# Altium PCB K601-6252双模带屏 VER 1.1 2026 10 16.PcbDoc (part 11 of 12)
Units mm, origin at the board's own origin, x right, y up, seen from the top; angles counter-clockwise.
Board outline 75.02 x 25.73 mm, 2 copper layers (Top Layer, Bottom Layer); 43 components, 67 nets, 219 pads, 157 vias.
Unrouted connection lines stored in the file: 1.
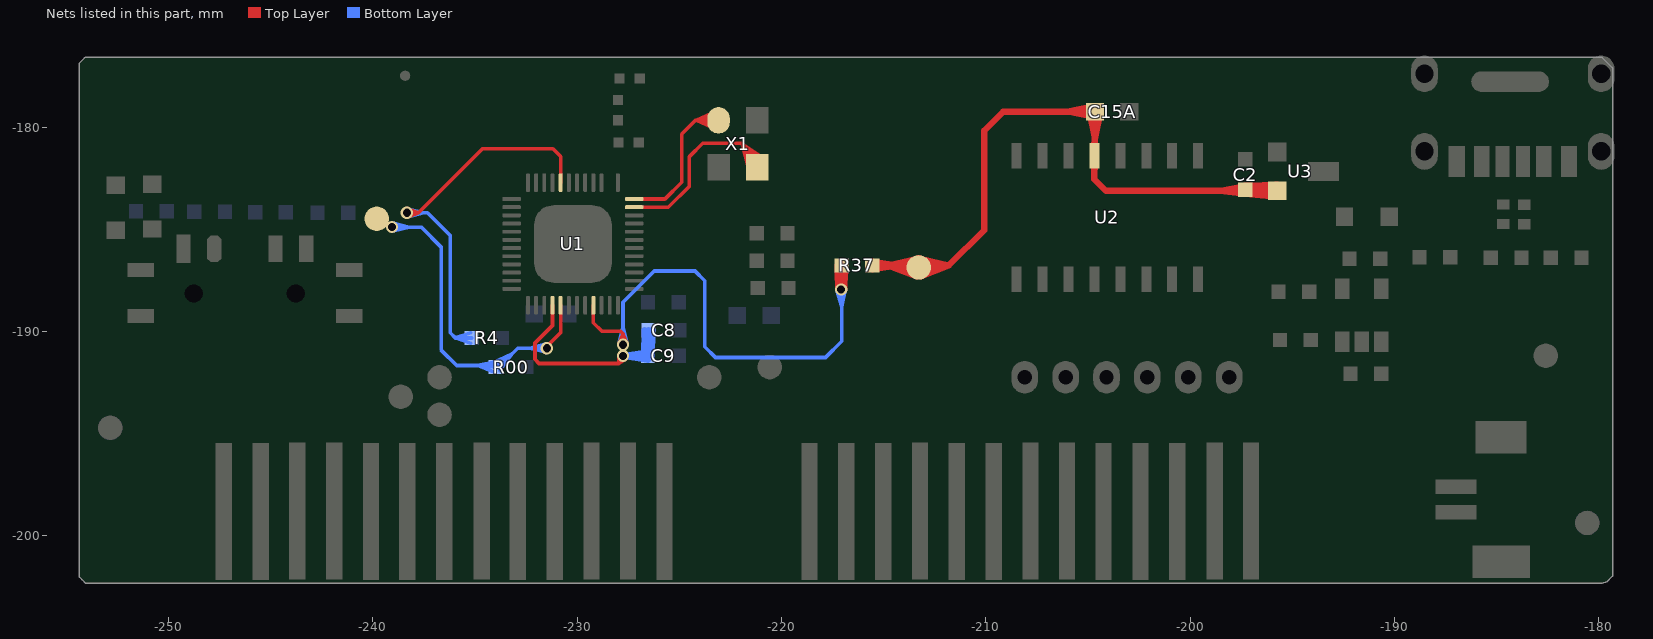
[diagram p11: the nets of this part, all layers, seen from the top]

## Via types
v1: diameter 0.6, hole 0.4, Top Layer to Bottom Layer, tented both sides, 154 vias
v2: diameter 0.6, hole 0.4, Top Layer to Bottom Layer, 3 vias

## Nets (pads, with @x,y where several pads share a name; then routed paths per layer and width w, separated by ;. In a path a pad name is that pad's centre, name@x,y a point inside that pad or via, vN(x,y) a via of type N, cw(c..) or ccw(c..) an arc to the next point about the centre after c; other vN are vias at no path point) (continued)
VCC3.3V: C2.1 C8.1 C9.1 C15A.2 pad.@-213.275,-186.873 R37.1 R37.2 U1.28 U1.33 U2.5 U3.2 | length 980.8
  Top Layer w0.18: U1.28@-231.2,-188.723 -231.2,-189.716 -232.057,-190.573 -232.057,-191.37 -231.859,-191.568 -227.955,-191.568 ; U1.33@-229.2,-188.723 -229.2,-189.573 ; v1@-227.735,-191.348 -227.955,-191.568 ; R37.1@-217.309,-186.792 v1@-217.104,-187.79 ; R37.1@-217.309,-186.748 v1@-217.272,-187.741 ; R37.1@-217.308,-186.805 v1@-217.07,-187.663 ; R37.1@-217.307,-186.809 v1@-217.038,-187.783 ; R37.1@-217.301,-186.839 v1@-216.915,-187.795 ; R37.1@-217.3,-186.844 v1@-216.92,-187.697 ; R37.1@-217.3,-186.843 v1@-216.921,-187.71 ; R37.1@-217.297,-186.853 v1@-216.87,-187.742 ; v1@-217.285,-187.959 -217.226,-187.116 v1@-216.875,-187.885 ; v1@-217.285,-187.958 R37.1@-217.226,-187.001 ; v1@-217.285,-187.956 R37.1@-217.217,-187.048 ; v1@-217.284,-187.972 R37.1@-217.284,-187.082 ; v1@-217.284,-187.963 R37.1@-217.242,-187.118 ; v1@-217.284,-187.93 R37.1@-217.101,-186.997 ; v1@-217.284,-187.924 R37.1@-217.05,-186.773 ; v1@-217.283,-187.974 R37.1@-217.298,-187.035 ; v1@-217.283,-187.92 R37.1@-217.068,-187.104 ; v1@-217.283,-187.917 R37.1@-217.057,-187.108 ; v1@-217.282,-187.914 R37.1@-217.046,-187.104 ; v1@-217.282,-187.911 R37.1@-217.017,-187.007 ; v1@-217.281,-187.909 R37.1@-217.014,-187.048 ; v1@-217.275,-187.883 R37.1@-216.885,-187.011 ; v1@-217.273,-187.878 R37.1@-216.881,-187.078 ; v1@-217.271,-187.873 -216.872,-187.123 ; v1@-217.269,-187.867 R37.1@-216.813,-187.041 ; v1@-217.269,-187.866 R37.1@-216.829,-187.089 ; v1@-216.878,-187.874 R37.1@-217.276,-187.114 ; v1@-216.877,-187.877 R37.1@-217.281,-187.057 ; v1@-216.876,-187.881 R37.1@-217.242,-187.118 ; v1@-216.873,-187.892 R37.1@-217.226,-187.001 ; v1@-216.868,-187.983 R37.1@-216.813,-187.041 ; v1@-216.868,-187.981 R37.1@-216.829,-187.089 ; v1@-216.867,-187.919 R37.1@-217.101,-186.997 ; v1@-216.867,-187.918 R37.1@-217.098,-187.046 ; v1@-216.867,-187.972 -216.872,-187.123 ; v1@-216.866,-187.967 R37.1@-216.885,-187.011 ; v1@-216.866,-187.965 R37.1@-216.894,-187.051 ; v1@-216.866,-187.929 R37.1@-217.046,-187.104 ; v1@-216.866,-187.923 R37.1@-217.068,-187.104 ; v1@-216.867,-187.92 R37.1@-217.093,-187.004 ; v1@-216.865,-187.939 R37.1@-217.009,-186.995 ; v1@-216.866,-187.933 R37.1@-217.05,-186.773 ; R37.1@-216.806,-186.863 v1@-217.272,-187.741 ; R37.1@-216.804,-186.856 -217.221,-187.678 ; R37.1@-216.804,-186.855 v1@-217.22,-187.689 ; R37.1@-216.802,-186.849 v1@-217.226,-187.782 ; R37.1@-216.794,-186.819 v1@-217.104,-187.79 ; R37.1@-216.794,-186.816 v1@-217.07,-187.663 ; R37.1@-216.792,-186.803 v1@-217.038,-187.783 ; R37.1@-216.79,-186.771 v1@-216.915,-187.795 ; R37.1@-216.79,-186.759 v1@-216.87,-187.742 ; -231.2,-189.713 U1.28@-231.2,-189.078 ; -231.2,-189.713 U1.28@-231.2,-189.078 ; -231.2,-189.713 U1.28@-231.2,-189.078 ; -229.2,-189.573 -228.775,-189.998 -227.875,-189.998 -227.75,-190.123 ; -229.2,-189.573 U1.33@-229.2,-189.078 ; -229.2,-189.573 U1.33@-229.2,-189.078 ; -229.2,-189.573 U1.33@-229.2,-189.078 ; v1@-227.956,-190.611 -227.75,-190.123 ; v1@-227.956,-190.611 -227.75,-190.123 ; v1@-227.956,-190.611 -227.75,-190.123 ; v1@-227.956,-190.611 -227.75,-190.123 ; -227.955,-191.568 v1@-227.597,-191.342 ; -227.955,-191.568 v1@-227.953,-191.145 ; -227.955,-191.568 v1(-227.75,-191.198) ; -227.955,-191.568 v1@-227.597,-191.342 ; -227.955,-191.568 v1@-227.953,-191.145 ; -227.955,-191.568 v1(-227.75,-191.198) ; -227.955,-191.568 v1@-227.597,-191.342 ; -227.955,-191.568 v1@-227.953,-191.145 ; -227.955,-191.568 v1(-227.75,-191.198) ; -227.955,-191.568 v1@-227.597,-191.342 ; -227.955,-191.568 v1@-227.953,-191.145 ; -227.955,-191.568 v1(-227.75,-191.198) ; -227.955,-191.568 v1@-227.597,-191.342 ; -227.955,-191.568 v1@-227.953,-191.145 ; -227.955,-191.568 v1(-227.75,-191.198) ; v1(-227.75,-190.653) -227.75,-190.123 ; v1(-227.75,-190.653) -227.75,-190.123 ; v1(-227.75,-190.653) -227.75,-190.123 ; -227.75,-190.123 v1@-227.544,-190.611 ; -227.75,-190.123 v1@-227.544,-190.611 ; -227.75,-190.123 v1@-227.544,-190.611 ; -227.75,-190.123 v1@-227.544,-190.611 ; R37.1@-217.31,-186.761 -217.221,-187.678 ; R37.1@-217.31,-186.761 v1@-217.226,-187.782 ; R37.1@-217.31,-186.761 v1@-217.22,-187.689 ; R37.1@-217.308,-186.803 v1@-217.075,-187.663 ; R37.1@-217.308,-186.803 v1@-217.075,-187.663 ; R37.1@-217.308,-186.803 v1@-217.075,-187.663 ; R37.1@-217.308,-186.803 v1@-217.075,-187.663 ; R37.1@-217.308,-186.803 v1@-217.075,-187.662 ; R37.1@-217.298,-187.035 -216.878,-187.875 R37.1@-217.284,-187.082 ; R37.1@-217.298,-187.035 v1(-217.075,-187.948) ; v1@-217.285,-187.958 R37.1@-217.227,-187.01 ; v1@-217.285,-187.959 R37.1@-217.227,-187.101 ; v1@-217.285,-187.959 R37.1@-217.23,-187.001 ; v1@-217.285,-187.96 R37.1@-217.233,-187.081 ; v1@-217.285,-187.96 R37.1@-217.233,-187.081 ; v1@-217.285,-187.96 R37.1@-217.233,-187.081 ; v1@-217.285,-187.96 R37.1@-217.233,-187.081 ; v1@-217.285,-187.96 R37.1@-217.233,-187.081 ; v1@-217.285,-187.96 R37.1@-217.233,-187.081 ; v1@-217.285,-187.96 R37.1@-217.233,-187.081 ; v1@-217.285,-187.96 R37.1@-217.233,-187.081 ; v1@-217.285,-187.96 R37.1@-217.233,-187.077 ; R37.1@-217.284,-187.082 v1(-217.075,-187.948) ; v1@-217.283,-187.921 R37.1@-217.075,-187.108 ; v1@-217.283,-187.921 R37.1@-217.075,-187.108 ; v1@-217.283,-187.921 R37.1@-217.075,-187.108 ; v1@-217.283,-187.921 R37.1@-217.075,-187.108 ; v1@-217.283,-187.918 R37.1@-217.059,-187.107 ; v1@-217.283,-187.918 R37.1@-217.059,-187.107 ; v1@-217.283,-187.918 R37.1@-217.059,-187.107 ; v1@-217.283,-187.918 R37.1@-217.059,-187.107 ; v1@-217.283,-187.917 -217.059,-187.108 v1@-216.866,-187.925 ; v1@-217.283,-187.918 R37.1@-217.059,-187.107 ; v1@-217.283,-187.918 R37.1@-217.059,-187.107 ; v1@-217.283,-187.918 R37.1@-217.059,-187.107 ; R37.1@-217.281,-187.057 -217.284,-187.971 R37.1@-217.276,-187.114 ; R37.1@-217.281,-187.057 v1(-217.075,-187.948) ; v1@-217.275,-187.882 R37.1@-216.874,-186.994 ; v1@-217.275,-187.883 R37.1@-216.894,-187.051 ; v1@-217.275,-187.883 R37.1@-216.879,-187.006 ; R37.1@-217.276,-187.114 v1(-217.075,-187.948) ; v1@-217.273,-187.878 R37.1@-216.881,-187.078 ; v1@-217.273,-187.878 R37.1@-216.881,-187.078 ; v1@-217.273,-187.878 R37.1@-216.881,-187.078 ; v1@-217.273,-187.878 R37.1@-216.881,-187.078 ; v1@-217.273,-187.877 -216.89,-187.121 -216.866,-187.968 R37.1@-216.879,-187.006 ; v1@-217.273,-187.878 R37.1@-216.881,-187.078 ; v1@-217.273,-187.878 R37.1@-216.881,-187.078 ; v1@-217.273,-187.878 R37.1@-216.881,-187.078 ; v1@-217.273,-187.877 R37.1@-216.886,-187.108 ; v1@-217.273,-187.878 R37.1@-216.88,-187.082 ; v1@-217.272,-187.741 R37.1@-217.05,-186.773 ; R37.1@-217.242,-187.118 v1(-217.075,-187.948) ; R37.1@-217.233,-187.081 v1@-216.874,-187.886 ; R37.1@-217.233,-187.081 v1(-217.075,-187.948) ; R37.1@-217.233,-187.081 v1@-216.874,-187.886 ; R37.1@-217.233,-187.081 v1(-217.075,-187.948) ; R37.1@-217.233,-187.081 v1@-216.874,-187.886 ; R37.1@-217.233,-187.081 v1(-217.075,-187.948) ; R37.1@-217.233,-187.081 v1@-216.874,-187.886 ; R37.1@-217.233,-187.081 v1(-217.075,-187.948) ; R37.1@-217.233,-187.081 v1@-216.874,-187.886 ; R37.1@-217.233,-187.081 v1(-217.075,-187.948) ; R37.1@-217.233,-187.081 v1@-216.874,-187.886 ; R37.1@-217.233,-187.081 v1(-217.075,-187.948) ; R37.1@-217.233,-187.081 v1@-216.874,-187.886 ; R37.1@-217.233,-187.081 v1(-217.075,-187.948) ; R37.1@-217.233,-187.081 v1@-216.874,-187.886 ; R37.1@-217.233,-187.081 v1(-217.075,-187.948) ; R37.1@-217.233,-187.077 v1@-216.874,-187.886 ; R37.1@-217.233,-187.077 v1(-217.075,-187.948) ; R37.1@-217.23,-187.001 v1@-216.873,-187.891 ; R37.1@-217.23,-187.001 v1(-217.075,-187.948) ; R37.1@-217.227,-187.101 v1@-216.874,-187.886 ; R37.1@-217.227,-187.101 v1(-217.075,-187.948) ; R37.1@-217.227,-187.01 v1@-216.873,-187.891 ; R37.1@-217.227,-187.01 v1(-217.075,-187.948) ; v1@-217.226,-187.782 R37.1@-217.05,-186.773 ; R37.1@-217.226,-187.001 v1(-217.075,-187.948) ; -217.221,-187.678 R37.1@-217.05,-186.773 ; v1@-217.22,-187.689 R37.1@-217.05,-186.773 ; R37.1@-217.217,-187.048 v1@-216.873,-187.891 ; R37.1@-217.217,-187.048 v1(-217.075,-187.948) ; v1@-217.104,-187.79 R37.1@-217.05,-186.773 ; R37.1@-217.101,-186.997 v1(-217.075,-187.948) ; R37.1@-217.098,-187.046 -217.284,-187.928 R37.1@-217.093,-187.004 ; R37.1@-217.098,-187.046 v1(-217.075,-187.948) ; R37.1@-217.093,-187.004 v1(-217.075,-187.948) ; v1(-217.075,-187.948) -217.075,-186.798 R37.1@-217.05,-186.773 ; v1(-217.075,-187.948) R37.1@-216.881,-187.078 ; v1(-217.075,-187.948) R37.1@-217.059,-187.107 ; v1(-217.075,-187.948) R37.1@-216.881,-187.078 ; v1(-217.075,-187.948) R37.1@-217.059,-187.107 ; v1(-217.075,-187.948) R37.1@-217.075,-187.108 ; v1(-217.075,-187.948) R37.1@-217.075,-187.108 ; v1(-217.075,-187.948) R37.1@-216.881,-187.078 ; v1(-217.075,-187.948) R37.1@-216.881,-187.078 ; v1(-217.075,-187.948) R37.1@-217.059,-187.107 ; v1(-217.075,-187.948) R37.1@-217.059,-187.107 ; v1(-217.075,-187.948) R37.1@-216.881,-187.078 ; v1(-217.075,-187.948) R37.1@-217.059,-187.107 ; v1(-217.075,-187.948) R37.1@-216.881,-187.078 ; v1(-217.075,-187.948) R37.1@-217.059,-187.107 ; v1(-217.075,-187.948) R37.1@-216.881,-187.078 ; v1(-217.075,-187.948) R37.1@-217.059,-187.107 ; v1(-217.075,-187.948) R37.1@-216.881,-187.078 ; v1(-217.075,-187.948) R37.1@-216.874,-186.994 ; v1(-217.075,-187.948) R37.1@-217.05,-186.773 ; v1(-217.075,-187.948) R37.1@-216.832,-187.074 ; v1(-217.075,-187.948) R37.1@-217.016,-187.016 ; v1(-217.075,-187.948) R37.1@-216.894,-187.051 ; v1(-217.075,-187.948) R37.1@-216.813,-187.041 ; v1(-217.075,-187.948) R37.1@-217.009,-186.995 ; v1(-217.075,-187.948) -216.872,-187.123 ; v1(-217.075,-187.948) R37.1@-217.046,-187.104 ; v1(-217.075,-187.948) R37.1@-216.885,-187.011 ; v1(-217.075,-187.948) R37.1@-216.829,-187.089 ; v1(-217.075,-187.948) R37.1@-217.014,-187.048 ; v1(-217.075,-187.948) R37.1@-216.886,-187.108 ; v1(-217.075,-187.948) R37.1@-217.068,-187.104 ; v1(-217.075,-187.948) R37.1@-216.879,-187.006 ; v1(-217.075,-187.948) R37.1@-216.831,-187.067 ; v1(-217.075,-187.948) R37.1@-217.017,-187.007 ; v1(-217.075,-187.948) R37.1@-216.88,-187.082 ; v1(-217.075,-187.948) R37.1@-217.057,-187.108 ; v1@-217.075,-187.663 R37.1@-216.794,-186.818 ; v1@-217.075,-187.663 R37.1@-217.05,-186.773 ; v1@-217.075,-187.663 R37.1@-216.794,-186.818 ; v1@-217.075,-187.663 R37.1@-217.05,-186.773 ; v1@-217.075,-187.663 R37.1@-216.794,-186.818 ; v1@-217.075,-187.663 R37.1@-217.05,-186.773 ; v1@-217.075,-187.663 R37.1@-216.794,-186.818 ; v1@-217.075,-187.663 R37.1@-217.05,-186.773 ; v1@-217.075,-187.662 R37.1@-216.794,-186.818 ; R37.1@-217.075,-187.108 v1@-216.867,-187.921 ; R37.1@-217.075,-187.108 v1@-216.867,-187.921 ; R37.1@-217.075,-187.108 v1@-216.867,-187.921 ; R37.1@-217.075,-187.108 v1@-216.867,-187.921 ; v1@-217.07,-187.663 R37.1@-217.05,-186.773 ; R37.1@-217.059,-187.107 v1@-216.866,-187.925 ; R37.1@-217.059,-187.107 v1@-216.866,-187.925 ; R37.1@-217.059,-187.107 v1@-216.866,-187.925 ; R37.1@-217.059,-187.107 v1@-216.866,-187.925 ; R37.1@-217.059,-187.107 v1@-216.866,-187.925 ; R37.1@-217.059,-187.107 v1@-216.866,-187.925 ; R37.1@-217.059,-187.107 v1@-216.866,-187.925 ; R37.1@-217.057,-187.108 v1@-216.866,-187.926 ; R37.1@-217.05,-186.773 v1@-216.921,-187.71 ; R37.1@-217.05,-186.773 v1@-216.87,-187.742 ; R37.1@-217.05,-186.773 v1@-217.038,-187.783 ; R37.1@-217.05,-186.773 v1@-216.915,-187.795 ; R37.1@-217.05,-186.773 v1@-216.92,-187.697 ; R37.1@-217.017,-187.007 v1@-216.865,-187.937 ; R37.1@-217.016,-187.016 -217.282,-187.911 R37.1@-217.009,-186.995 ; R37.1@-217.016,-187.016 v1@-216.865,-187.937 ; R37.1@-217.014,-187.048 v1@-216.865,-187.937 ; v1@-216.921,-187.71 -216.79,-186.773 v1@-216.92,-187.697 ; R37.1@-216.886,-187.108 v1@-216.866,-187.968 ; R37.1@-216.88,-187.082 v1@-216.866,-187.969 ; R37.1@-216.881,-187.078 v1@-216.866,-187.969 ; R37.1@-216.881,-187.078 v1@-216.866,-187.969 ; R37.1@-216.881,-187.078 v1@-216.866,-187.969 ; R37.1@-216.881,-187.078 v1@-216.866,-187.969 ; R37.1@-216.881,-187.078 v1@-216.866,-187.969 ; R37.1@-216.881,-187.078 v1@-216.866,-187.969 ; R37.1@-216.881,-187.078 v1@-216.866,-187.969 ; R37.1@-216.881,-187.078 v1@-216.866,-187.969 ; R37.1@-216.874,-186.994 v1@-216.866,-187.969 ; R37.1@-216.832,-187.074 -217.27,-187.868 R37.1@-216.831,-187.067 ; R37.1@-216.832,-187.074 -216.868,-187.98 R37.1@-216.831,-187.067
  Top Layer w0.305: U2.5@-204.685,-181.398 -204.685,-182.558 ; -204.651,-179.858 U2.5@-204.685,-181.018 ; C2.1@-197.333,-183.27 U3.2@-196.019,-183.394 ; C2.1@-197.33,-183.271 U3.2@-196.059,-183.363 ; C2.1@-197.329,-183.271 U3.2@-196.054,-183.357 ; C2.1@-197.327,-183.271 U3.2@-195.986,-183.354 ; C2.1@-197.321,-182.879 U3.2@-196.006,-182.839 ; C2.1@-197.316,-182.879 U3.2@-196.043,-182.875 ; C2.1@-197.296,-183.273 U3.2@-195.971,-183.146 ; C2.1@-197.291,-183.273 U3.2@-196.036,-183.116 ; C2.1@-197.287,-183.273 U3.2@-195.972,-183.089 ; C2.1@-197.283,-182.879 U3.2@-195.972,-183.089 ; C2.1@-197.278,-182.879 U3.2@-196.036,-183.116 ; C2.1@-197.277,-182.879 U3.2@-196.032,-183.125 ; C2.1@-197.275,-182.88 U3.2@-195.971,-183.146 ; C2.1@-197.257,-183.269 U3.2@-195.971,-182.881 ; C2.1@-197.255,-183.268 U3.2@-196.031,-182.88 ; C2.1@-197.254,-183.268 U3.2@-196.043,-182.875 ; C2.1@-197.25,-183.267 U3.2@-196.006,-182.839 ; C2.1@-197.245,-182.886 U3.2@-195.986,-183.354 ; C2.1@-197.242,-182.887 U3.2@-196.054,-183.357 ; C2.1@-197.241,-182.887 U3.2@-196.059,-183.363 ; C2.1@-197.238,-182.888 U3.2@-196.019,-183.394 ; U3.2@-195.824,-183.418 C2.1@-197.17,-182.879 ; U3.2@-195.818,-183.42 C2.1@-197.223,-182.894 ; U3.2@-195.805,-182.827 C2.1@-197.181,-183.28 ; U3.2@-195.801,-182.826 C2.1@-197.115,-183.249 ; U3.2@-195.799,-182.826 C2.1@-197.22,-183.257 ; U3.2@-195.798,-182.826 C2.1@-197.197,-183.25 ; U3.2@-195.786,-183.427 C2.1@-197.195,-183.06 ; U3.2@-195.783,-183.427 C2.1@-197.113,-183.086 ; U3.2@-195.767,-182.821 C2.1@-197.196,-183.098 ; U3.2@-195.764,-182.821 C2.1@-197.113,-183.078 ; U3.2@-195.747,-183.43 C2.1@-197.115,-183.249 ; U3.2@-195.744,-183.43 C2.1@-197.231,-183.26 ; U3.2@-195.726,-182.821 C2.1@-197.101,-182.908 ; R37.2@-215.55,-186.773 -211.8,-186.773 ; R37.2@-215.55,-186.773 -214.286,-186.773 ; R37.2@-215.55,-186.773 -214.286,-186.773 ; R37.2@-215.535,-186.97 -214.286,-186.773 ; R37.2@-215.535,-186.97 -214.286,-186.773 ; R37.2@-215.535,-186.97 -214.286,-186.773 ; R37.2@-215.535,-186.97 -214.286,-186.773 ; R37.2@-215.535,-186.576 -214.286,-186.773 ; R37.2@-215.535,-186.576 -214.286,-186.773 ; R37.2@-215.535,-186.576 -214.286,-186.773 ; R37.2@-215.535,-186.576 -214.286,-186.773 ; -214.794,-186.773 pad.@-213.37,-187.31 ; -214.794,-186.773 pad.@-213.312,-186.427 ; -214.794,-186.773 pad.@-213.275,-186.873 ; -214.794,-186.773 pad.@-213.37,-187.31 ; -214.794,-186.773 pad.@-213.312,-186.427 ; -214.794,-186.773 pad.@-213.275,-186.873 ; -214.794,-186.773 pad.@-213.37,-187.31 ; -214.794,-186.773 pad.@-213.312,-186.427 ; -214.794,-186.773 pad.@-213.275,-186.873 ; -214.794,-186.773 pad.@-213.37,-187.31 ; -214.794,-186.773 pad.@-213.312,-186.427 ; -214.794,-186.773 pad.@-213.275,-186.873 ; pad.@-213.37,-187.31 -214.787,-186.773 pad.@-213.312,-186.427 ; pad.@-213.275,-186.873 -211.8,-186.773 ; pad.@-213.275,-186.873 -211.8,-186.773 ; pad.@-213.275,-186.873 -211.8,-186.773 ; pad.@-213.275,-186.873 -211.8,-186.773 ; pad.@-213.237,-186.427 -211.8,-186.773 ; pad.@-213.237,-186.427 -211.8,-186.773 ; pad.@-213.237,-186.427 -211.8,-186.773 ; pad.@-213.237,-186.427 -211.8,-186.773 ; pad.@-213.237,-186.427 -211.8,-186.773 ; pad.@-213.178,-187.309 -211.8,-186.773 ; pad.@-213.178,-187.309 -211.8,-186.773 ; pad.@-213.178,-187.309 -211.8,-186.773 ; pad.@-213.178,-187.309 -211.8,-186.773 ; pad.@-213.178,-187.309 -211.8,-186.773 ; -211.8,-186.773 -210.075,-185.048 -210.075,-180.173 -209.15,-179.248 C15A.2@-204.651,-179.248 ; -206.016,-179.248 C15A.2@-204.704,-179.519 ; -206.016,-179.248 C15A.2@-204.704,-178.976 ; -206.016,-179.248 C15A.2@-204.676,-179.248 ; -206.016,-179.248 C15A.2@-204.704,-179.519 ; -206.016,-179.248 C15A.2@-204.704,-178.976 ; -206.016,-179.248 C15A.2@-204.676,-179.248 ; -206.016,-179.248 C15A.2@-204.704,-179.519 ; -206.016,-179.248 C15A.2@-204.704,-178.976 ; -206.016,-179.248 C15A.2@-204.676,-179.248 ; -206.016,-179.248 C15A.2@-204.704,-179.519 ; -206.016,-179.248 C15A.2@-204.704,-178.976 ; -206.016,-179.248 C15A.2@-204.676,-179.248 ; -206.016,-179.248 C15A.2@-204.704,-179.519 ; -206.016,-179.248 C15A.2@-204.704,-178.976 ; -206.016,-179.248 C15A.2@-204.676,-179.248 ; C15A.2@-204.923,-179.275 -204.651,-180.587 ; C15A.2@-204.923,-179.275 -204.651,-180.587 ; C15A.2@-204.923,-179.275 -204.651,-180.587 ; C15A.2@-204.923,-179.275 -204.651,-180.587 ; -204.685,-182.558 -204.12,-183.123 -195.743,-183.123 U3.2@-195.741,-183.125 ; -204.685,-182.558 U2.5@-204.685,-181.778 ; -204.685,-182.558 U2.5@-204.685,-181.778 ; -204.685,-182.558 U2.5@-204.685,-181.778 ; U2.5@-204.685,-181.778 -204.651,-182.046 ; U2.5@-204.685,-181.778 -204.651,-182.046 ; U2.5@-204.685,-181.778 -204.651,-182.046 ; U2.5@-204.685,-181.018 -204.651,-179.858 U2.5@-204.685,-181.018 ; -204.651,-182.046 C15A.2@-204.651,-179.248 ; -204.651,-180.587 C15A.2@-204.38,-179.275 ; -204.651,-180.587 C15A.2@-204.38,-179.275 ; -204.651,-180.587 C15A.2@-204.38,-179.275 ; -204.651,-180.587 C15A.2@-204.651,-179.248 ; -204.651,-180.587 C15A.2@-204.38,-179.275 ; -204.651,-180.587 C15A.2@-204.651,-179.248 ; -198.567,-183.123 C2.1@-197.308,-183.273 ; -198.567,-183.123 C2.1@-197.323,-182.879 ; -198.567,-183.123 C2.1@-197.3,-183.076 ; -198.567,-183.123 C2.1@-197.308,-183.273 ; -198.567,-183.123 C2.1@-197.323,-182.879 ; -198.567,-183.123 C2.1@-197.3,-183.076 ; -198.567,-183.123 C2.1@-197.308,-183.273 ; -198.567,-183.123 C2.1@-197.323,-182.879 ; -198.567,-183.123 C2.1@-197.3,-183.076 ; -198.567,-183.123 C2.1@-197.308,-183.273 ; -198.567,-183.123 C2.1@-197.323,-182.879 ; -198.567,-183.123 C2.1@-197.3,-183.076 ; C2.1@-197.323,-182.879 -198.564,-183.122 C2.1@-197.308,-183.273 ; C2.1@-197.3,-183.076 U3.2@-196.034,-183.123 ; C2.1@-197.3,-183.076 U3.2@-196.034,-183.123 ; C2.1@-197.3,-183.076 U3.2@-196.006,-182.839 ; C2.1@-197.3,-183.076 U3.2@-195.972,-183.089 ; C2.1@-197.3,-183.076 U3.2@-196.043,-182.875 ; C2.1@-197.3,-183.076 U3.2@-196.036,-183.116 ; C2.1@-197.3,-183.076 U3.2@-196.031,-182.88 ; C2.1@-197.3,-183.076 U3.2@-196.032,-183.125 ; C2.1@-197.3,-183.076 U3.2@-196.034,-183.123 ; C2.1@-197.3,-183.076 U3.2@-195.986,-183.354 ; C2.1@-197.3,-183.076 U3.2@-196.054,-183.357 ; C2.1@-197.3,-183.076 U3.2@-196.019,-183.394 ; C2.1@-197.3,-183.076 U3.2@-195.971,-182.881 ; C2.1@-197.3,-183.076 U3.2@-195.971,-183.146 ; C2.1@-197.3,-183.076 U3.2@-196.059,-183.363 ; C2.1@-197.3,-183.076 U3.2@-196.034,-183.123 ; C2.1@-197.292,-183.273 U3.2@-196.034,-183.123 ; C2.1@-197.292,-183.273 U3.2@-196.034,-183.123 ; C2.1@-197.292,-183.273 -196.036,-183.123 C2.1@-197.277,-182.879 ; C2.1@-197.292,-183.273 U3.2@-196.032,-183.125 ; C2.1@-197.292,-183.273 U3.2@-196.034,-183.123 ; C2.1@-197.292,-183.273 U3.2@-196.034,-183.123 ; C2.1@-197.277,-182.879 U3.2@-196.034,-183.123 ; C2.1@-197.277,-182.879 U3.2@-196.034,-183.123 ; C2.1@-197.277,-182.879 U3.2@-196.034,-183.123 ; C2.1@-197.277,-182.879 U3.2@-196.034,-183.123 ; C2.1@-197.232,-183.093 -195.778,-183.428 C2.1@-197.196,-183.098 ; C2.1@-197.232,-183.093 U3.2@-195.765,-182.821 ; C2.1@-197.232,-183.093 U3.2@-195.741,-183.125 ; C2.1@-197.232,-183.063 U3.2@-195.784,-183.427 ; C2.1@-197.232,-183.063 U3.2@-195.759,-182.821 ; C2.1@-197.232,-183.063 U3.2@-195.741,-183.125 ; C2.1@-197.231,-183.26 -195.799,-182.826 C2.1@-197.228,-183.259 ; C2.1@-197.231,-183.26 U3.2@-195.741,-183.125 ; C2.1@-197.231,-183.092 -195.779,-183.428 C2.1@-197.224,-183.093 ; C2.1@-197.231,-183.092 U3.2@-195.765,-182.821 ; C2.1@-197.231,-183.092 U3.2@-195.741,-183.125 ; C2.1@-197.228,-183.259 -195.744,-183.43 C2.1@-197.22,-183.257 ; C2.1@-197.228,-183.259 U3.2@-195.741,-183.125 ; C2.1@-197.224,-183.093 U3.2@-195.765,-182.821 ; C2.1@-197.224,-183.093 U3.2@-195.741,-183.125 ; C2.1@-197.224,-183.064 U3.2@-195.784,-183.427 ; C2.1@-197.224,-183.064 U3.2@-195.759,-182.821 ; C2.1@-197.224,-183.064 U3.2@-195.741,-183.125 ; C2.1@-197.223,-182.894 U3.2@-195.725,-182.821 ; C2.1@-197.223,-182.894 U3.2@-195.741,-183.125 ; C2.1@-197.22,-183.257 U3.2@-195.741,-183.125 ; C2.1@-197.219,-182.896 U3.2@-195.818,-183.42 ; C2.1@-197.219,-182.896 U3.2@-195.725,-182.821 ; C2.1@-197.219,-182.896 U3.2@-195.741,-183.125 ; C2.1@-197.217,-183.281 U3.2@-195.74,-183.43 ; C2.1@-197.217,-183.281 U3.2@-195.804,-182.827 ; C2.1@-197.217,-183.281 U3.2@-195.741,-183.125 ; C2.1@-197.216,-183.063 -195.785,-183.427 C2.1@-197.113,-183.078 ; C2.1@-197.216,-183.063 U3.2@-195.759,-182.821 ; C2.1@-197.216,-183.063 U3.2@-195.741,-183.125 ; C2.1@-197.217,-182.896 U3.2@-195.818,-183.42 ; C2.1@-197.217,-182.896 U3.2@-195.725,-182.821 ; C2.1@-197.217,-182.896 U3.2@-195.741,-183.125 ; C2.1@-197.211,-183.28 U3.2@-195.74,-183.43 ; C2.1@-197.211,-183.28 U3.2@-195.804,-182.827 ; C2.1@-197.211,-183.28 U3.2@-195.741,-183.125 ; C2.1@-197.208,-182.876 U3.2@-195.822,-183.419 ; C2.1@-197.208,-182.876 U3.2@-195.721,-182.821 ; C2.1@-197.208,-182.876 U3.2@-195.741,-183.125 ; C2.1@-197.204,-183.28 U3.2@-195.74,-183.43 ; C2.1@-197.204,-183.28 U3.2@-195.804,-182.827 ; C2.1@-197.204,-183.28 U3.2@-195.741,-183.125 ; C2.1@-197.197,-183.25 U3.2@-195.746,-183.43 ; C2.1@-197.197,-183.25 U3.2@-195.741,-183.125 ; C2.1@-197.196,-183.098 U3.2@-195.741,-183.125 ; C2.1@-197.195,-183.06 U3.2@-195.759,-182.821 ; C2.1@-197.195,-183.06 U3.2@-195.741,-183.125 ; C2.1@-197.194,-182.878 U3.2@-195.823,-183.419 ; C2.1@-197.194,-182.878 U3.2@-195.721,-182.821 ; C2.1@-197.194,-182.878 U3.2@-195.741,-183.125 ; C2.1@-197.189,-182.907 U3.2@-195.817,-183.42 ; C2.1@-197.189,-182.907 U3.2@-195.727,-182.821 ; C2.1@-197.189,-182.907 U3.2@-195.741,-183.125 ; C2.1@-197.186,-182.879 U3.2@-195.823,-183.419 ; C2.1@-197.186,-182.879 U3.2@-195.721,-182.821 ; C2.1@-197.186,-182.879 U3.2@-195.741,-183.125 ; C2.1@-197.181,-183.28 U3.2@-195.74,-183.43 ; C2.1@-197.181,-183.28 U3.2@-195.741,-183.125 ; C2.1@-197.17,-182.879 U3.2@-195.721,-182.821 ; C2.1@-197.17,-182.879 U3.2@-195.741,-183.125 ; C2.1@-197.115,-183.249 U3.2@-195.741,-183.125 ; C2.1@-197.113,-183.086 U3.2@-195.766,-182.821 ; C2.1@-197.113,-183.086 U3.2@-195.741,-183.125 ; C2.1@-197.112,-183.251 U3.2@-195.747,-183.43 ; C2.1@-197.112,-183.251 U3.2@-195.802,-182.827 ; C2.1@-197.112,-183.251 U3.2@-195.741,-183.125 ; C2.1@-197.112,-183.123 U3.2@-195.775,-183.428 ; C2.1@-197.112,-183.123 U3.2@-195.774,-182.822 ; C2.1@-197.112,-183.123 U3.2@-195.741,-183.125 ; C2.1@-197.112,-183.123 U3.2@-195.775,-183.428 ; C2.1@-197.112,-183.123 U3.2@-195.774,-182.822 ; C2.1@-197.112,-183.123 U3.2@-195.741,-183.125 ; C2.1@-197.112,-183.123 U3.2@-195.775,-183.428 ; C2.1@-197.112,-183.123 U3.2@-195.774,-182.822 ; C2.1@-197.112,-183.123 U3.2@-195.775,-183.428 ; C2.1@-197.112,-183.123 U3.2@-195.774,-182.822 ; C2.1@-197.112,-183.123 U3.2@-195.741,-183.125 ; C2.1@-197.112,-183.123 U3.2@-195.775,-183.428 ; C2.1@-197.112,-183.123 U3.2@-195.774,-182.822 ; C2.1@-197.112,-183.123 U3.2@-195.741,-183.125 ; C2.1@-197.112,-183.083 U3.2@-195.784,-183.427 ; C2.1@-197.112,-183.083 U3.2@-195.765,-182.821 ; C2.1@-197.112,-183.083 U3.2@-195.741,-183.125 ; C2.1@-197.113,-183.078 U3.2@-195.741,-183.125 ; C2.1@-197.111,-183.251 U3.2@-195.746,-183.43 ; C2.1@-197.111,-183.251 U3.2@-195.802,-182.827 ; C2.1@-197.111,-183.251 U3.2@-195.741,-183.125 ; C2.1@-197.111,-183.251 U3.2@-195.746,-183.43 ; C2.1@-197.111,-183.251 U3.2@-195.802,-182.827 ; C2.1@-197.111,-183.251 U3.2@-195.741,-183.125 ; C2.1@-197.111,-183.251 U3.2@-195.746,-183.43 ; C2.1@-197.111,-183.251 U3.2@-195.802,-182.827 ; C2.1@-197.111,-183.251 U3.2@-195.741,-183.125 ; C2.1@-197.111,-183.251 U3.2@-195.746,-183.43 ; C2.1@-197.111,-183.251 U3.2@-195.802,-182.827 ; C2.1@-197.111,-183.251 U3.2@-195.741,-183.125 ; C2.1@-197.111,-183.251 U3.2@-195.746,-183.43 ; C2.1@-197.111,-183.251 U3.2@-195.802,-182.827 ; C2.1@-197.111,-183.251 U3.2@-195.741,-183.125 ; C2.1@-197.111,-183.251 U3.2@-195.746,-183.43 ; C2.1@-197.111,-183.251 U3.2@-195.802,-182.827 ; C2.1@-197.111,-183.251 U3.2@-195.741,-183.125 ; C2.1@-197.111,-183.251 U3.2@-195.746,-183.43 ; C2.1@-197.111,-183.251 U3.2@-195.802,-182.827 ; C2.1@-197.111,-183.251 U3.2@-195.741,-183.125 ; C2.1@-197.111,-183.251 U3.2@-195.746,-183.43 ; C2.1@-197.111,-183.251 U3.2@-195.802,-182.827 ; C2.1@-197.111,-183.251 U3.2@-195.741,-183.125 ; C2.1@-197.112,-183.083 U3.2@-195.784,-183.427 ; C2.1@-197.112,-183.083 U3.2@-195.765,-182.821 ; C2.1@-197.112,-183.083 U3.2@-195.741,-183.125 ; C2.1@-197.112,-183.083 U3.2@-195.784,-183.427 ; C2.1@-197.112,-183.083 U3.2@-195.765,-182.821 ; C2.1@-197.112,-183.083 U3.2@-195.741,-183.125 ; C2.1@-197.112,-183.083 U3.2@-195.784,-183.427 ; C2.1@-197.112,-183.083 U3.2@-195.765,-182.821 ; C2.1@-197.112,-183.083 U3.2@-195.741,-183.125 ; C2.1@-197.112,-183.083 U3.2@-195.784,-183.427 ; C2.1@-197.112,-183.083 U3.2@-195.765,-182.821 ; C2.1@-197.112,-183.083 U3.2@-195.784,-183.427 ; C2.1@-197.112,-183.083 U3.2@-195.765,-182.821 ; C2.1@-197.112,-183.083 U3.2@-195.741,-183.125 ; C2.1@-197.112,-183.083 U3.2@-195.784,-183.427 ; C2.1@-197.112,-183.083 U3.2@-195.765,-182.821 ; C2.1@-197.112,-183.083 U3.2@-195.741,-183.125 ; C2.1@-197.112,-183.083 U3.2@-195.784,-183.427 ; C2.1@-197.112,-183.083 U3.2@-195.765,-182.821 ; C2.1@-197.112,-183.083 U3.2@-195.741,-183.125 ; C2.1@-197.112,-183.083 U3.2@-195.784,-183.427 ; C2.1@-197.112,-183.083 U3.2@-195.765,-182.821 ; C2.1@-197.112,-183.083 U3.2@-195.741,-183.125 ; C2.1@-197.112,-183.082 U3.2@-195.784,-183.427 ; C2.1@-197.112,-183.082 U3.2@-195.765,-182.821 ; C2.1@-197.112,-183.082 U3.2@-195.741,-183.125 ; C2.1@-197.111,-183.252 U3.2@-195.746,-183.43 ; C2.1@-197.111,-183.252 U3.2@-195.802,-182.827 ; C2.1@-197.111,-183.252 U3.2@-195.741,-183.125 ; C2.1@-197.108,-183.255 U3.2@-195.746,-183.43 ; C2.1@-197.108,-183.255 U3.2@-195.803,-182.827 ; C2.1@-197.108,-183.255 U3.2@-195.741,-183.125 ; C2.1@-197.108,-182.914 U3.2@-195.82,-183.419 ; C2.1@-197.108,-182.914 U3.2@-195.728,-182.821 ; C2.1@-197.108,-182.914 U3.2@-195.741,-183.125 ; C2.1@-197.106,-182.913 U3.2@-195.82,-183.419 ; C2.1@-197.106,-182.913 U3.2@-195.727,-182.821 ; C2.1@-197.106,-182.913 U3.2@-195.741,-183.125 ; C2.1@-197.106,-182.913 U3.2@-195.82,-183.419 ; C2.1@-197.106,-182.913 U3.2@-195.727,-182.821 ; C2.1@-197.106,-182.913 U3.2@-195.741,-183.125 ; C2.1@-197.106,-182.913 U3.2@-195.82,-183.419 ; C2.1@-197.106,-182.913 U3.2@-195.727,-182.821 ; C2.1@-197.106,-182.913 U3.2@-195.741,-183.125 ; C2.1@-197.106,-182.913 U3.2@-195.82,-183.419 ; C2.1@-197.106,-182.913 U3.2@-195.727,-182.821 ; C2.1@-197.106,-182.913 U3.2@-195.741,-183.125 ; C2.1@-197.107,-182.913 U3.2@-195.82,-183.419 ; C2.1@-197.107,-182.913 U3.2@-195.727,-182.821 ; C2.1@-197.107,-182.913 U3.2@-195.741,-183.125 ; C2.1@-197.107,-182.913 U3.2@-195.82,-183.419 ; C2.1@-197.107,-182.913 U3.2@-195.727,-182.821 ; C2.1@-197.107,-182.913 U3.2@-195.741,-183.125 ; C2.1@-197.106,-182.913 U3.2@-195.82,-183.419 ; C2.1@-197.106,-182.913 U3.2@-195.727,-182.821 ; C2.1@-197.106,-182.913 U3.2@-195.741,-183.125 ; C2.1@-197.106,-182.913 U3.2@-195.82,-183.419 ; C2.1@-197.106,-182.913 U3.2@-195.727,-182.821 ; C2.1@-197.106,-182.913 U3.2@-195.741,-183.125 ; C2.1@-197.106,-182.913 U3.2@-195.82,-183.419 ; C2.1@-197.106,-182.913 U3.2@-195.727,-182.821 ; C2.1@-197.106,-182.913 U3.2@-195.741,-183.125 ; C2.1@-197.105,-182.912 -195.821,-183.419 -197.101,-182.914 U3.2@-195.727,-182.821 ; C2.1@-197.105,-182.912 U3.2@-195.727,-182.821 ; C2.1@-197.105,-182.912 U3.2@-195.741,-183.125 ; C2.1@-197.101,-182.908 U3.2@-195.822,-183.419 ; C2.1@-197.101,-182.908 U3.2@-195.741,-183.125 ; U3.2@-196.031,-182.88 -197.315,-182.879 U3.2@-195.971,-182.881 ; U3.2@-195.802,-182.827 -197.108,-183.251 U3.2@-195.747,-183.43
  Bottom Layer w0.18: v1@-217.05,-188.223 -217.05,-190.488 -217.838,-191.275 -223.225,-191.275 -223.753,-190.748 -223.753,-187.52 -224.225,-187.048 -226.223,-187.048 -227.75,-188.575 v1(-227.75,-190.653) ; v1@-227.958,-190.627 -227.75,-189.813 ; v1@-227.958,-190.627 -227.75,-189.813 ; v1@-227.958,-190.627 -227.75,-189.813 ; v1@-227.958,-190.627 -227.75,-189.813 ; v1(-227.75,-190.653) -227.75,-189.813 ; v1(-227.75,-190.653) -227.75,-189.813 ; -227.75,-189.813 v1@-227.542,-190.627 ; -227.75,-189.813 v1@-227.542,-190.627 ; -227.75,-189.813 v1@-227.542,-190.627 ; -227.75,-189.813 v1@-227.542,-190.627 ; v1@-217.283,-187.98 -217.05,-188.796 ; v1@-217.283,-187.98 -217.05,-188.796 ; v1@-217.283,-187.98 -217.05,-188.796 ; v1@-217.283,-187.98 -217.05,-188.787 v1@-216.866,-187.968 ; v1@-217.283,-187.98 -217.05,-188.796 ; v1(-217.075,-187.948) -217.05,-188.796 ; v1(-217.075,-187.948) -217.05,-188.796 ; v1(-217.075,-187.948) -217.05,-188.796 ; v1(-217.075,-187.948) -217.05,-188.796 ; -217.05,-188.796 v1@-216.866,-187.967 ; -217.05,-188.796 v1@-216.866,-187.967 ; -217.05,-188.796 v1@-216.866,-187.967 ; -217.05,-188.796 v1@-216.866,-187.967
  Bottom Layer w0.305: v1(-227.75,-191.198) C9.1@-226.525,-191.198 ; v1(-227.75,-191.198) C9.1@-226.541,-191.395 ; v1(-227.75,-191.198) C9.1@-226.541,-191.001 ; v1(-227.75,-191.198) C9.1@-226.541,-191.395 ; v1(-227.75,-191.198) C9.1@-226.541,-191.001 ; v1(-227.75,-191.198) C9.1@-226.541,-191.395 ; v1(-227.75,-191.198) C9.1@-226.541,-191.001 ; v1(-227.75,-191.198) C9.1@-226.525,-191.198 ; v1(-227.75,-191.198) C9.1@-226.541,-191.395 ; v1(-227.75,-191.198) C9.1@-226.541,-191.001 ; v1(-227.75,-191.198) C9.1@-226.525,-191.198 ; C9.1@-226.722,-191.209 C8.1@-226.697,-189.959 ; C9.1@-226.722,-191.209 C8.1@-226.309,-189.997 ; C9.1@-226.722,-191.209 C8.1@-226.697,-189.928 ; C9.1@-226.722,-191.209 C8.1@-226.5,-189.948 ; C9.1@-226.722,-191.209 C8.1@-226.697,-189.928 ; C9.1@-226.722,-191.209 C8.1@-226.693,-189.99 ; C9.1@-226.722,-191.209 C8.1@-226.309,-189.997 ; C9.1@-226.722,-191.209 C8.1@-226.697,-189.928 ; C9.1@-226.722,-191.209 C8.1@-226.5,-189.948 ; C9.1@-226.722,-191.209 C8.1@-226.309,-189.997 ; C9.1@-226.722,-191.209 C8.1@-226.697,-189.928 ; C9.1@-226.722,-191.209 C8.1@-226.5,-189.948 ; C9.1@-226.722,-191.182 C8.1@-226.525,-189.973 ; C9.1@-226.722,-191.182 C8.1@-226.309,-189.998 ; C9.1@-226.722,-191.182 C8.1@-226.697,-189.928 ; C9.1@-226.722,-191.182 C8.1@-226.5,-189.948 ; C9.1@-226.722,-191.182 C8.1@-226.525,-189.973 ; C9.1@-226.722,-191.182 C8.1@-226.525,-189.973 ; C9.1@-226.722,-191.182 C8.1@-226.525,-189.973 ; C9.1@-226.722,-191.182 C8.1@-226.309,-189.998 ; C9.1@-226.722,-191.182 C8.1@-226.697,-189.928 ; C9.1@-226.722,-191.182 C8.1@-226.5,-189.948 ; C9.1@-226.722,-191.182 C8.1@-226.309,-189.998 ; C9.1@-226.722,-191.182 C8.1@-226.697,-189.928 ; C9.1@-226.722,-191.182 C8.1@-226.5,-189.948 ; C9.1@-226.722,-191.182 C8.1@-226.309,-189.998 ; C9.1@-226.722,-191.182 C8.1@-226.697,-189.928 ; C9.1@-226.722,-191.182 C8.1@-226.5,-189.948 ; C9.1@-226.722,-191.182 C8.1@-226.309,-189.998 ; C9.1@-226.722,-191.182 C8.1@-226.697,-189.928 ; C9.1@-226.722,-191.182 C8.1@-226.309,-189.998 ; C9.1@-226.722,-191.182 C8.1@-226.697,-189.928 ; C9.1@-226.722,-191.182 C8.1@-226.5,-189.948 ; C9.1@-226.722,-191.182 C8.1@-226.309,-189.998 ; C9.1@-226.722,-191.182 C8.1@-226.697,-189.928 ; C9.1@-226.722,-191.182 C8.1@-226.5,-189.948 ; C9.1@-226.722,-191.182 C8.1@-226.309,-189.998 ; C9.1@-226.722,-191.182 C8.1@-226.697,-189.928 ; C9.1@-226.722,-191.182 C8.1@-226.5,-189.948 ; C9.1@-226.722,-191.178 C8.1@-226.5,-189.948 ; C9.1@-226.722,-191.178 C8.1@-226.5,-189.948 ; C9.1@-226.722,-191.178 C8.1@-226.5,-189.948 ; C9.1@-226.722,-191.178 C8.1@-226.309,-189.998 ; C9.1@-226.722,-191.178 C8.1@-226.697,-189.928 ; C9.1@-226.722,-191.178 C8.1@-226.309,-189.998 ; C9.1@-226.722,-191.178 C8.1@-226.697,-189.928 ; C9.1@-226.722,-191.178 C8.1@-226.309,-189.998 ; C9.1@-226.722,-191.178 C8.1@-226.697,-189.928 ; C9.1@-226.716,-191.148 C8.1@-226.303,-189.936 ; C9.1@-226.716,-191.148 C8.1@-226.309,-189.998 ; C9.1@-226.716,-191.148 C8.1@-226.697,-189.928 ; C9.1@-226.716,-191.148 C8.1@-226.5,-189.948 ; C9.1@-226.716,-191.147 C8.1@-226.303,-189.967 ; C9.1@-226.716,-191.147 C8.1@-226.309,-189.998 ; C9.1@-226.716,-191.147 C8.1@-226.309,-189.998 ; C9.1@-226.716,-191.147 C8.1@-226.697,-189.928 ; C9.1@-226.716,-191.147 C8.1@-226.5,-189.948 ; C9.1@-226.716,-191.147 C8.1@-226.309,-189.998 ; C9.1@-226.716,-191.147 C8.1@-226.697,-189.928 ; C9.1@-226.716,-191.147 C8.1@-226.5,-189.948 ; C8.1@-226.697,-189.959 C9.1@-226.525,-191.198 ; C8.1@-226.697,-189.959 C9.1@-226.332,-191.155 ; C8.1@-226.697,-189.959 C9.1@-226.525,-191.198 ; C8.1@-226.697,-189.959 C9.1@-226.525,-191.198 ; C8.1@-226.697,-189.959 C9.1@-226.525,-191.198 ; C8.1@-226.697,-189.959 C9.1@-226.525,-191.198 ; C8.1@-226.697,-189.959 C9.1@-226.525,-191.198 ; C8.1@-226.697,-189.959 C9.1@-226.525,-191.198 ; C8.1@-226.697,-189.959 C9.1@-226.525,-191.198 ; C8.1@-226.697,-189.959 C9.1@-226.525,-191.198 ; C8.1@-226.697,-189.959 C9.1@-226.525,-191.198 ; C8.1@-226.697,-189.959 C9.1@-226.525,-191.198 ; C8.1@-226.697,-189.959 C9.1@-226.525,-191.198 ; C8.1@-226.697,-189.959 C9.1@-226.525,-191.198 ; C8.1@-226.697,-189.928 C9.1@-226.332,-191.156 ; C8.1@-226.697,-189.928 C9.1@-226.525,-191.198 ; C8.1@-226.693,-189.99 C9.1@-226.328,-191.182 ; C8.1@-226.693,-189.99 C9.1@-226.332,-191.155 ; C8.1@-226.693,-189.99 C9.1@-226.525,-191.198 ; C8.1@-226.693,-189.99 C9.1@-226.328,-191.182 ; C8.1@-226.693,-189.99 C9.1@-226.328,-191.182 ; C8.1@-226.693,-189.99 C9.1@-226.328,-191.182 ; C8.1@-226.693,-189.99 C9.1@-226.328,-191.182 ; C8.1@-226.693,-189.991 C9.1@-226.332,-191.156 ; C8.1@-226.693,-189.99 C9.1@-226.328,-191.182 ; C8.1@-226.693,-189.99 C9.1@-226.328,-191.182 ; C8.1@-226.693,-189.99 C9.1@-226.328,-191.182 ; C8.1@-226.693,-189.991 C9.1@-226.332,-191.155 ; C8.1@-226.693,-189.99 C9.1@-226.328,-191.186 ; C8.1@-226.693,-189.99 C9.1@-226.328,-191.186 ; C8.1@-226.693,-189.991 C9.1@-226.332,-191.155 ; C8.1@-226.693,-189.99 C9.1@-226.328,-191.186 ; C8.1@-226.693,-189.989 C9.1@-226.328,-191.217 ; C8.1@-226.693,-189.989 C9.1@-226.328,-191.217 ; C8.1@-226.693,-189.989 C9.1@-226.328,-191.217 ; C9.1@-226.525,-191.198 C8.1@-226.525,-189.973 ; C9.1@-226.525,-191.198 C8.1@-226.303,-189.967 ; C9.1@-226.525,-191.198 C8.1@-226.5,-189.948 ; C9.1@-226.525,-191.198 C8.1@-226.525,-189.973 ; C9.1@-226.525,-191.198 C8.1@-226.525,-189.973 ; C9.1@-226.525,-191.198 C8.1@-226.309,-189.998 ; C9.1@-226.525,-191.198 C8.1@-226.5,-189.948 ; C9.1@-226.525,-191.198 C8.1@-226.303,-189.936 ; C9.1@-226.525,-191.198 C8.1@-226.5,-189.948 ; C9.1@-226.525,-191.198 C8.1@-226.303,-189.967 ; C9.1@-226.525,-191.198 C8.1@-226.5,-189.948 ; C9.1@-226.525,-191.198 C8.1@-226.303,-189.967 ; C9.1@-226.525,-191.198 C8.1@-226.5,-189.948 ; C9.1@-226.525,-191.198 C8.1@-226.303,-189.967 ; C9.1@-226.525,-191.198 C8.1@-226.5,-189.948 ; C9.1@-226.525,-191.198 C8.1@-226.303,-189.967 ; C9.1@-226.525,-191.198 C8.1@-226.303,-189.967 ; C9.1@-226.525,-191.198 C8.1@-226.5,-189.948 ; C9.1@-226.525,-191.198 C8.1@-226.303,-189.967 ; C9.1@-226.525,-191.198 C8.1@-226.5,-189.948 ; C9.1@-226.525,-191.198 C8.1@-226.303,-189.967 ; C9.1@-226.525,-191.198 C8.1@-226.5,-189.948 ; C9.1@-226.525,-191.198 C8.1@-226.303,-189.967 ; C9.1@-226.525,-191.198 C8.1@-226.5,-189.948 ; C9.1@-226.525,-191.198 C8.1@-226.303,-189.967 ; C9.1@-226.525,-191.198 C8.1@-226.303,-189.967 ; C9.1@-226.525,-191.198 C8.1@-226.5,-189.948 ; C9.1@-226.525,-191.198 C8.1@-226.303,-189.967 ; C9.1@-226.525,-191.198 C8.1@-226.5,-189.948 ; C9.1@-226.525,-191.198 C8.1@-226.303,-189.967 ; C8.1@-226.525,-189.973 C8.1@-226.5,-189.948 ; C8.1@-226.525,-189.973 C9.1@-226.328,-191.182 ; C8.1@-226.525,-189.973 C9.1@-226.328,-191.182 ; C8.1@-226.525,-189.973 C9.1@-226.328,-191.182 ; C8.1@-226.525,-189.973 C9.1@-226.328,-191.182 ; C8.1@-226.5,-189.948 C9.1@-226.328,-191.182 ; C8.1@-226.5,-189.948 C9.1@-226.328,-191.186 ; C8.1@-226.5,-189.948 C9.1@-226.328,-191.186 ; C8.1@-226.5,-189.948 C9.1@-226.328,-191.186 ; C8.1@-226.5,-189.948 C9.1@-226.328,-191.182 ; C8.1@-226.5,-189.948 C9.1@-226.328,-191.182 ; C8.1@-226.5,-189.948 C9.1@-226.328,-191.182 ; C8.1@-226.5,-189.948 C9.1@-226.332,-191.156 ; C8.1@-226.5,-189.948 C9.1@-226.328,-191.182 ; C8.1@-226.5,-189.948 C9.1@-226.328,-191.182 ; C8.1@-226.5,-189.948 C9.1@-226.328,-191.182 ; C8.1@-226.5,-189.948 C9.1@-226.328,-191.217 ; C8.1@-226.5,-189.948 C9.1@-226.332,-191.155 ; C8.1@-226.5,-189.948 C9.1@-226.328,-191.217 ; C8.1@-226.5,-189.948 C9.1@-226.328,-191.217 ; C8.1@-226.5,-189.948 C9.1@-226.332,-191.155 ; C9.1@-226.332,-191.155 C8.1@-226.303,-189.936 ; C9.1@-226.332,-191.156 C8.1@-226.303,-189.936 ; C9.1@-226.332,-191.155 C8.1@-226.303,-189.936 ; C9.1@-226.328,-191.217 C8.1@-226.303,-189.967 ; C9.1@-226.328,-191.217 C8.1@-226.303,-189.936 ; C9.1@-226.328,-191.217 C8.1@-226.303,-189.936 ; C9.1@-226.328,-191.217 C8.1@-226.303,-189.936 ; C9.1@-226.328,-191.217 C8.1@-226.309,-189.998 ; C9.1@-226.328,-191.217 C8.1@-226.303,-189.936 ; C9.1@-226.328,-191.186 C8.1@-226.303,-189.936 ; C9.1@-226.328,-191.186 C8.1@-226.303,-189.936 ; C9.1@-226.328,-191.186 C8.1@-226.303,-189.936 ; C9.1@-226.328,-191.182 C8.1@-226.303,-189.936 ; C9.1@-226.328,-191.182 C8.1@-226.303,-189.936 ; C9.1@-226.328,-191.182 C8.1@-226.303,-189.936 ; C9.1@-226.328,-191.182 C8.1@-226.303,-189.936 ; C9.1@-226.328,-191.182 C8.1@-226.303,-189.936 ; C9.1@-226.328,-191.182 C8.1@-226.303,-189.936 ; C9.1@-226.328,-191.182 C8.1@-226.303,-189.936 ; C9.1@-226.328,-191.182 C8.1@-226.303,-189.936
VDD_LED: R4.2 U1.8 | length 42.6
  Top Layer w0.18: U1.8@-230.8,-182.723 -230.8,-181.448 -231.18,-181.068 -234.622,-181.068 -237.752,-184.198 ; v1(-238.325,-184.198) -237.752,-184.198 ; v1(-238.325,-184.198) -237.752,-184.198 ; v1(-238.325,-184.198) -237.752,-184.198 ; v1@-238.287,-184.404 -237.752,-184.198 ; v1@-238.287,-184.404 -237.752,-184.198 ; v1@-238.287,-184.404 -237.752,-184.198 ; v1@-238.287,-184.404 -237.752,-184.198 ; v1@-238.287,-183.991 -237.752,-184.198 ; v1@-238.287,-183.991 -237.752,-184.198 ; v1@-238.287,-183.991 -237.752,-184.198 ; v1@-238.287,-183.991 -237.752,-184.198 ; U1.8@-230.8,-182.368 -230.8,-181.733 ; U1.8@-230.8,-182.368 -230.8,-181.733 ; U1.8@-230.8,-182.368 -230.8,-181.733
  Bottom Layer w0.18: v1(-238.325,-184.198) -237.32,-184.198 -236.207,-185.311 -236.207,-190.066 -235.95,-190.323 ; v1(-238.325,-184.198) -237.485,-184.198 ; v1(-238.325,-184.198) -237.485,-184.198 ; v1@-238.299,-184.406 -237.485,-184.198 ; v1@-238.299,-184.406 -237.485,-184.198 ; v1@-238.299,-184.406 -237.485,-184.198 ; v1@-238.299,-184.406 -237.485,-184.198 ; v1@-238.299,-183.989 -237.485,-184.198 ; v1@-238.299,-183.989 -237.485,-184.198 ; v1@-238.299,-183.989 -237.485,-184.198 ; v1@-238.299,-183.989 -237.485,-184.198 ; -235.95,-190.323 R4.2@-235.166,-190.323 ; -235.95,-190.323 R4.2@-235.209,-190.579 ; -235.95,-190.323 R4.2@-235.209,-190.066 ; -235.95,-190.323 R4.2@-235.209,-190.579 ; -235.95,-190.323 R4.2@-235.209,-190.066 ; -235.95,-190.323 R4.2@-235.209,-190.579 ; -235.95,-190.323 R4.2@-235.209,-190.066 ; -235.95,-190.323 R4.2@-235.166,-190.323 ; -235.95,-190.323 R4.2@-235.209,-190.579 ; -235.95,-190.323 R4.2@-235.209,-190.066 ; -235.95,-190.323 R4.2@-235.166,-190.323
VPP: pad.@-239.8,-184.495 R00.2 U1.29 | length 65.6
  Top Layer w0.18: v1@-231.475,-190.734 -230.8,-190.059 U1.29@-230.8,-188.723 ; -230.8,-189.713 U1.29@-230.8,-189.078 ; -230.8,-189.713 U1.29@-230.8,-189.078 ; -230.8,-189.713 U1.29@-230.8,-189.078
  Bottom Layer w0.18: R00.2@-234.111,-191.526 -233.205,-191.124 R00.2@-233.786,-191.926 ; v1(-239.05,-184.898) -237.625,-184.898 -236.65,-185.873 -236.65,-190.905 -235.888,-191.668 -233.745,-191.668 -232.9,-190.823 v1(-231.475,-190.823) ; v1(-239.05,-184.898) -238.21,-184.898 ; v1(-239.05,-184.898) -238.21,-184.898 ; v1@-239.024,-185.106 -238.21,-184.898 ; v1@-239.024,-185.106 -238.21,-184.898 ; v1@-239.024,-185.106 -238.21,-184.898 ; v1@-239.024,-185.106 -238.21,-184.898 ; v1@-239.024,-184.689 -238.21,-184.898 ; v1@-239.024,-184.689 -238.21,-184.898 ; v1@-239.024,-184.689 -238.21,-184.898 ; v1@-239.024,-184.689 -238.21,-184.898 ; -234.869,-191.668 R00.2@-234.035,-192 ; -234.869,-191.668 R00.2@-233.99,-191.488 ; -234.869,-191.668 R00.2@-233.975,-191.748 ; -234.869,-191.668 R00.2@-234.035,-192 ; -234.869,-191.668 R00.2@-233.99,-191.488 ; -234.869,-191.668 R00.2@-233.975,-191.748 ; -234.869,-191.668 R00.2@-234.035,-192 ; -234.869,-191.668 R00.2@-233.99,-191.488 ; -234.869,-191.668 R00.2@-233.975,-191.748 ; -234.869,-191.668 R00.2@-234.035,-192 ; -234.869,-191.668 R00.2@-233.99,-191.488 ; -234.869,-191.668 R00.2@-233.975,-191.748 ; R00.2@-234.112,-191.526 -233.185,-191.108 ; R00.2@-234.112,-191.526 -233.185,-191.108 ; R00.2@-234.112,-191.526 -233.185,-191.108 ; R00.2@-234.112,-191.526 -233.185,-191.108 ; R00.2@-234.036,-192 -234.863,-191.668 R00.2@-233.99,-191.488 ; R00.2@-233.975,-191.748 -233.185,-191.108 ; R00.2@-233.975,-191.748 -233.185,-191.108 ; R00.2@-233.975,-191.748 -233.185,-191.108 ; R00.2@-233.975,-191.748 -233.185,-191.108 ; R00.2@-233.787,-191.927 -233.185,-191.108 ; R00.2@-233.787,-191.927 -233.185,-191.108 ; R00.2@-233.787,-191.927 -233.185,-191.108 ; R00.2@-233.787,-191.927 -233.185,-191.108 ; -232.315,-190.823 v1@-231.501,-191.031 ; -232.315,-190.823 v1@-231.501,-190.614 ; -232.315,-190.823 v1(-231.475,-190.823) ; -232.315,-190.823 v1@-231.501,-191.031 ; -232.315,-190.823 v1@-231.501,-190.614 ; -232.315,-190.823 v1(-231.475,-190.823) ; -232.315,-190.823 v1@-231.501,-191.031 ; -232.315,-190.823 v1@-231.501,-190.614 ; -232.315,-190.823 v1(-231.475,-190.823) ; -232.315,-190.823 v1@-231.501,-191.031 ; -232.315,-190.823 v1@-231.501,-190.614 ; -232.315,-190.823 v1(-231.475,-190.823) ; -232.315,-190.823 v1@-231.501,-191.031 ; -232.315,-190.823 v1@-231.501,-190.614 ; -232.315,-190.823 v1(-231.475,-190.823)
XC1: U1.48 X1.1 | length 67.9
  Top Layer w0.18: U1.48@-227.2,-183.522 -225.7,-183.522 -224.875,-182.698 -224.875,-180.348 -224.2,-179.673 X1.1@-223.075,-179.673 ; U1.48@-226.845,-183.522 -226.21,-183.522 ; U1.48@-226.845,-183.522 -226.21,-183.522 ; U1.48@-226.845,-183.522 -226.21,-183.522 ; -224.165,-179.673 X1.1@-223.172,-180.122 ; -224.165,-179.673 X1.1@-223.172,-179.223 ; -224.165,-179.673 X1.1@-223.111,-179.95 ; -224.165,-179.673 X1.1@-223.111,-179.395 ; -224.165,-179.673 X1.1@-223.08,-179.772 ; -224.165,-179.673 X1.1@-223.08,-179.573 ; -224.165,-179.673 X1.1@-223.172,-180.122 ; -224.165,-179.673 X1.1@-223.172,-179.223 ; -224.165,-179.673 X1.1@-223.111,-179.95 ; -224.165,-179.673 X1.1@-223.111,-179.395 ; -224.165,-179.673 X1.1@-223.08,-179.772 ; -224.165,-179.673 X1.1@-223.08,-179.573 ; -224.165,-179.673 X1.1@-223.172,-180.122 ; -224.165,-179.673 X1.1@-223.172,-179.223 ; -224.165,-179.673 X1.1@-223.111,-179.95 ; -224.165,-179.673 X1.1@-223.111,-179.395 ; -224.165,-179.673 X1.1@-223.08,-179.772 ; -224.165,-179.673 X1.1@-223.08,-179.573 ; -224.165,-179.673 X1.1@-223.075,-179.673 ; -224.165,-179.673 X1.1@-223.172,-180.122 ; -224.165,-179.673 X1.1@-223.172,-179.223 ; -224.165,-179.673 X1.1@-223.111,-179.95 ; -224.165,-179.673 X1.1@-223.111,-179.395 ; -224.165,-179.673 X1.1@-223.08,-179.772 ; -224.165,-179.673 X1.1@-223.08,-179.573 ; -224.165,-179.673 X1.1@-223.075,-179.673 ; -224.165,-179.673 X1.1@-223.172,-180.122 ; -224.165,-179.673 X1.1@-223.172,-179.223 ; -224.165,-179.673 X1.1@-223.111,-179.95 ; -224.165,-179.673 X1.1@-223.111,-179.395 ; -224.165,-179.673 X1.1@-223.08,-179.772 ; -224.165,-179.673 X1.1@-223.08,-179.573 ; -224.165,-179.673 X1.1@-223.075,-179.673 ; -224.165,-179.673 X1.1@-223.172,-180.122 ; -224.165,-179.673 X1.1@-223.172,-179.223 ; -224.165,-179.673 X1.1@-223.111,-179.95 ; -224.165,-179.673 X1.1@-223.111,-179.395 ; -224.165,-179.673 X1.1@-223.08,-179.772 ; -224.165,-179.673 X1.1@-223.08,-179.573 ; -224.165,-179.673 X1.1@-223.075,-179.673 ; -224.165,-179.673 X1.1@-223.172,-180.122 ; -224.165,-179.673 X1.1@-223.172,-179.223 ; -224.165,-179.673 X1.1@-223.111,-179.95 ; -224.165,-179.673 X1.1@-223.111,-179.395 ; -224.165,-179.673 X1.1@-223.08,-179.772 ; -224.165,-179.673 X1.1@-223.08,-179.573 ; -224.165,-179.673 X1.1@-223.075,-179.673 ; -224.165,-179.673 X1.1@-223.172,-180.122 ; -224.165,-179.673 X1.1@-223.172,-179.223 ; -224.165,-179.673 X1.1@-223.111,-179.95 ; -224.165,-179.673 X1.1@-223.111,-179.395 ; -224.165,-179.673 X1.1@-223.08,-179.772 ; -224.165,-179.673 X1.1@-223.08,-179.573 ; -224.165,-179.673 X1.1@-223.075,-179.673
XC2: U1.47 X1.2 | length 89.8
  Top Layer w0.18: U1.47@-227.2,-183.923 -225.53,-183.923 -224.5,-182.893 -224.5,-181.448 -223.85,-180.798 -221.95,-180.798 -221.175,-181.573 X1.2@-221.175,-181.973 ; X1.2@-221.593,-182.064 -221.89,-180.861 ; X1.2@-221.592,-182.066 -221.901,-180.857 ; X1.2@-221.42,-182.009 -221.901,-180.857 ; X1.2@-220.967,-181.686 -221.888,-180.868 ; X1.2@-220.857,-181.54 -221.89,-180.869 ; X1.2@-220.855,-181.542 -221.89,-180.861 ; U1.47@-226.845,-183.923 -226.21,-183.923 ; U1.47@-226.845,-183.923 -226.21,-183.923 ; U1.47@-226.845,-183.923 -226.21,-183.923 ; -221.908,-180.84 X1.2@-221.592,-182.066 ; -221.908,-180.84 X1.2@-220.854,-181.543 ; -221.908,-180.84 X1.2@-221.42,-182.008 ; -221.908,-180.84 X1.2@-220.966,-181.686 ; -221.908,-180.84 X1.2@-221.259,-181.927 ; -221.908,-180.84 X1.2@-221.096,-181.812 ; -221.908,-180.84 X1.2@-221.175,-181.873 ; -221.908,-180.84 X1.2@-221.592,-182.066 ; -221.908,-180.84 X1.2@-220.854,-181.543 ; -221.908,-180.84 X1.2@-221.42,-182.008 ; -221.908,-180.84 X1.2@-220.966,-181.686 ; -221.908,-180.84 X1.2@-221.259,-181.927 ; -221.908,-180.84 X1.2@-221.096,-181.812 ; -221.908,-180.84 X1.2@-221.175,-181.873 ; -221.908,-180.84 X1.2@-221.592,-182.066 ; -221.908,-180.84 X1.2@-220.854,-181.543 ; -221.908,-180.84 X1.2@-221.42,-182.008 ; -221.908,-180.84 X1.2@-220.966,-181.686 ; -221.908,-180.84 X1.2@-221.259,-181.927 ; -221.908,-180.84 X1.2@-221.096,-181.812 ; -221.908,-180.84 X1.2@-221.175,-181.873 ; -221.908,-180.84 X1.2@-221.592,-182.066 ; -221.908,-180.84 X1.2@-220.854,-181.543 ; -221.908,-180.84 X1.2@-221.42,-182.008 ; -221.908,-180.84 X1.2@-220.966,-181.686 ; -221.908,-180.84 X1.2@-221.259,-181.927 ; -221.908,-180.84 X1.2@-221.096,-181.812 ; -221.908,-180.84 X1.2@-221.175,-181.873 ; -221.908,-180.84 X1.2@-221.592,-182.066 ; -221.908,-180.84 X1.2@-220.854,-181.543 ; -221.908,-180.84 X1.2@-221.42,-182.008 ; -221.908,-180.84 X1.2@-220.966,-181.686 ; -221.908,-180.84 X1.2@-221.259,-181.927 ; -221.908,-180.84 X1.2@-221.096,-181.812 ; -221.908,-180.84 X1.2@-221.175,-181.873 ; -221.901,-180.857 -220.856,-181.541 -221.888,-180.868 ; -221.901,-180.857 -220.967,-181.685 -221.89,-180.869 ; -221.901,-180.857 X1.2@-221.259,-181.927 ; -221.901,-180.857 -221.096,-181.811 -221.89,-180.869 ; -221.901,-180.857 X1.2@-221.175,-181.873 ; -221.89,-180.869 -221.593,-182.065 -221.888,-180.868 ; -221.89,-180.869 X1.2@-221.42,-182.008 ; -221.89,-180.869 X1.2@-221.259,-181.927 ; -221.89,-180.869 X1.2@-221.175,-181.873 ; -221.89,-180.861 -221.42,-182.007 -221.888,-180.868 ; -221.89,-180.861 X1.2@-220.966,-181.686 ; -221.89,-180.861 X1.2@-221.259,-181.927 ; -221.89,-180.861 X1.2@-221.096,-181.812 ; -221.89,-180.861 X1.2@-221.175,-181.873 ; -221.888,-180.868 X1.2@-221.259,-181.927 ; -221.888,-180.868 X1.2@-221.096,-181.811 ; -221.888,-180.868 X1.2@-221.175,-181.873
ZA: 
ZB: 
pads on no net: SW1.3 SW1.9 SW1.10 U1.6 U1.7 U1.9 U2.1 U2.2 U2.3 U2.14 U2.15 U2.16

## Polygon pours and split planes (outlines as drawn)
GND on Bottom Layer "TopLayer-No Net 2" (hatched 45Degree grid 0.15 track 0.152, remove dead copper, pour order 4): -179.856,-202.323 -254.05,-202.323 -254.175,-202.323 -254.55,-201.948 -254.625,-201.873 -254.625,-201.298 -254.625,-182.573 -254.075,-182.023 -253.599,-181.546 -252.65,-181.546 -237.524,-181.546 -236.075,-180.098 -235.653,-179.676 -235.1,-179.676 -227.303,-179.676 -227.15,-179.523 -227.003,-179.376 -227.003,-177.423 -227.003,-176.676 -226.775,-176.448 -226.625,-176.298 -226.175,-176.298 -179.9,-176.298 -179.6,-176.598 -179.3,-176.898 -179.3,-178.398 -179.3,-201.948 -179.6,-202.248
GND on Top Layer "TopLayer-No Net 2" (hatched 45Degree grid 0.15 track 0.152, remove dead copper, pour order 6): -180.275,-202.398 -186.655,-202.398 -188.605,-202.398 -189.076,-201.927 -190.163,-200.84 -190.163,-196.889 -190.163,-195.479 -190.7,-194.942 -191.079,-194.563 -198.506,-194.563 -253.924,-194.563 -254.3,-194.188 -254.325,-194.163 -254.325,-193.448 -254.325,-181.592 -253.85,-181.116 -253.681,-180.948 -251.95,-180.948 -250.36,-180.948 -249.761,-181.546 -249.335,-181.973 -248.958,-181.973 -238.478,-181.973 -237.524,-181.018 -235.978,-179.473 -232.45,-179.473 -227.425,-179.473 -227.35,-179.398 -227.013,-179.061 -227.003,-179.061 -227.003,-177.576 -227.005,-177.574 -227.005,-176.498 -227.005,-176.465 -226.937,-176.398 -226.812,-176.273 -179.675,-176.273 -179.525,-176.273 -179.45,-176.348 -179.25,-176.548 -179.25,-177.573 -179.25,-201.723 -179.85,-202.323